# Altium PCB QR SCANNER NEW.PcbDoc (part 2 of 2)
Units mm, origin at the board's own origin, x right, y up, seen from the top; angles counter-clockwise.
Board outline 130 x 105 mm, 2 copper layers (Top Layer, Bottom Layer); 158 components, 113 nets, 501 pads, 106 vias.
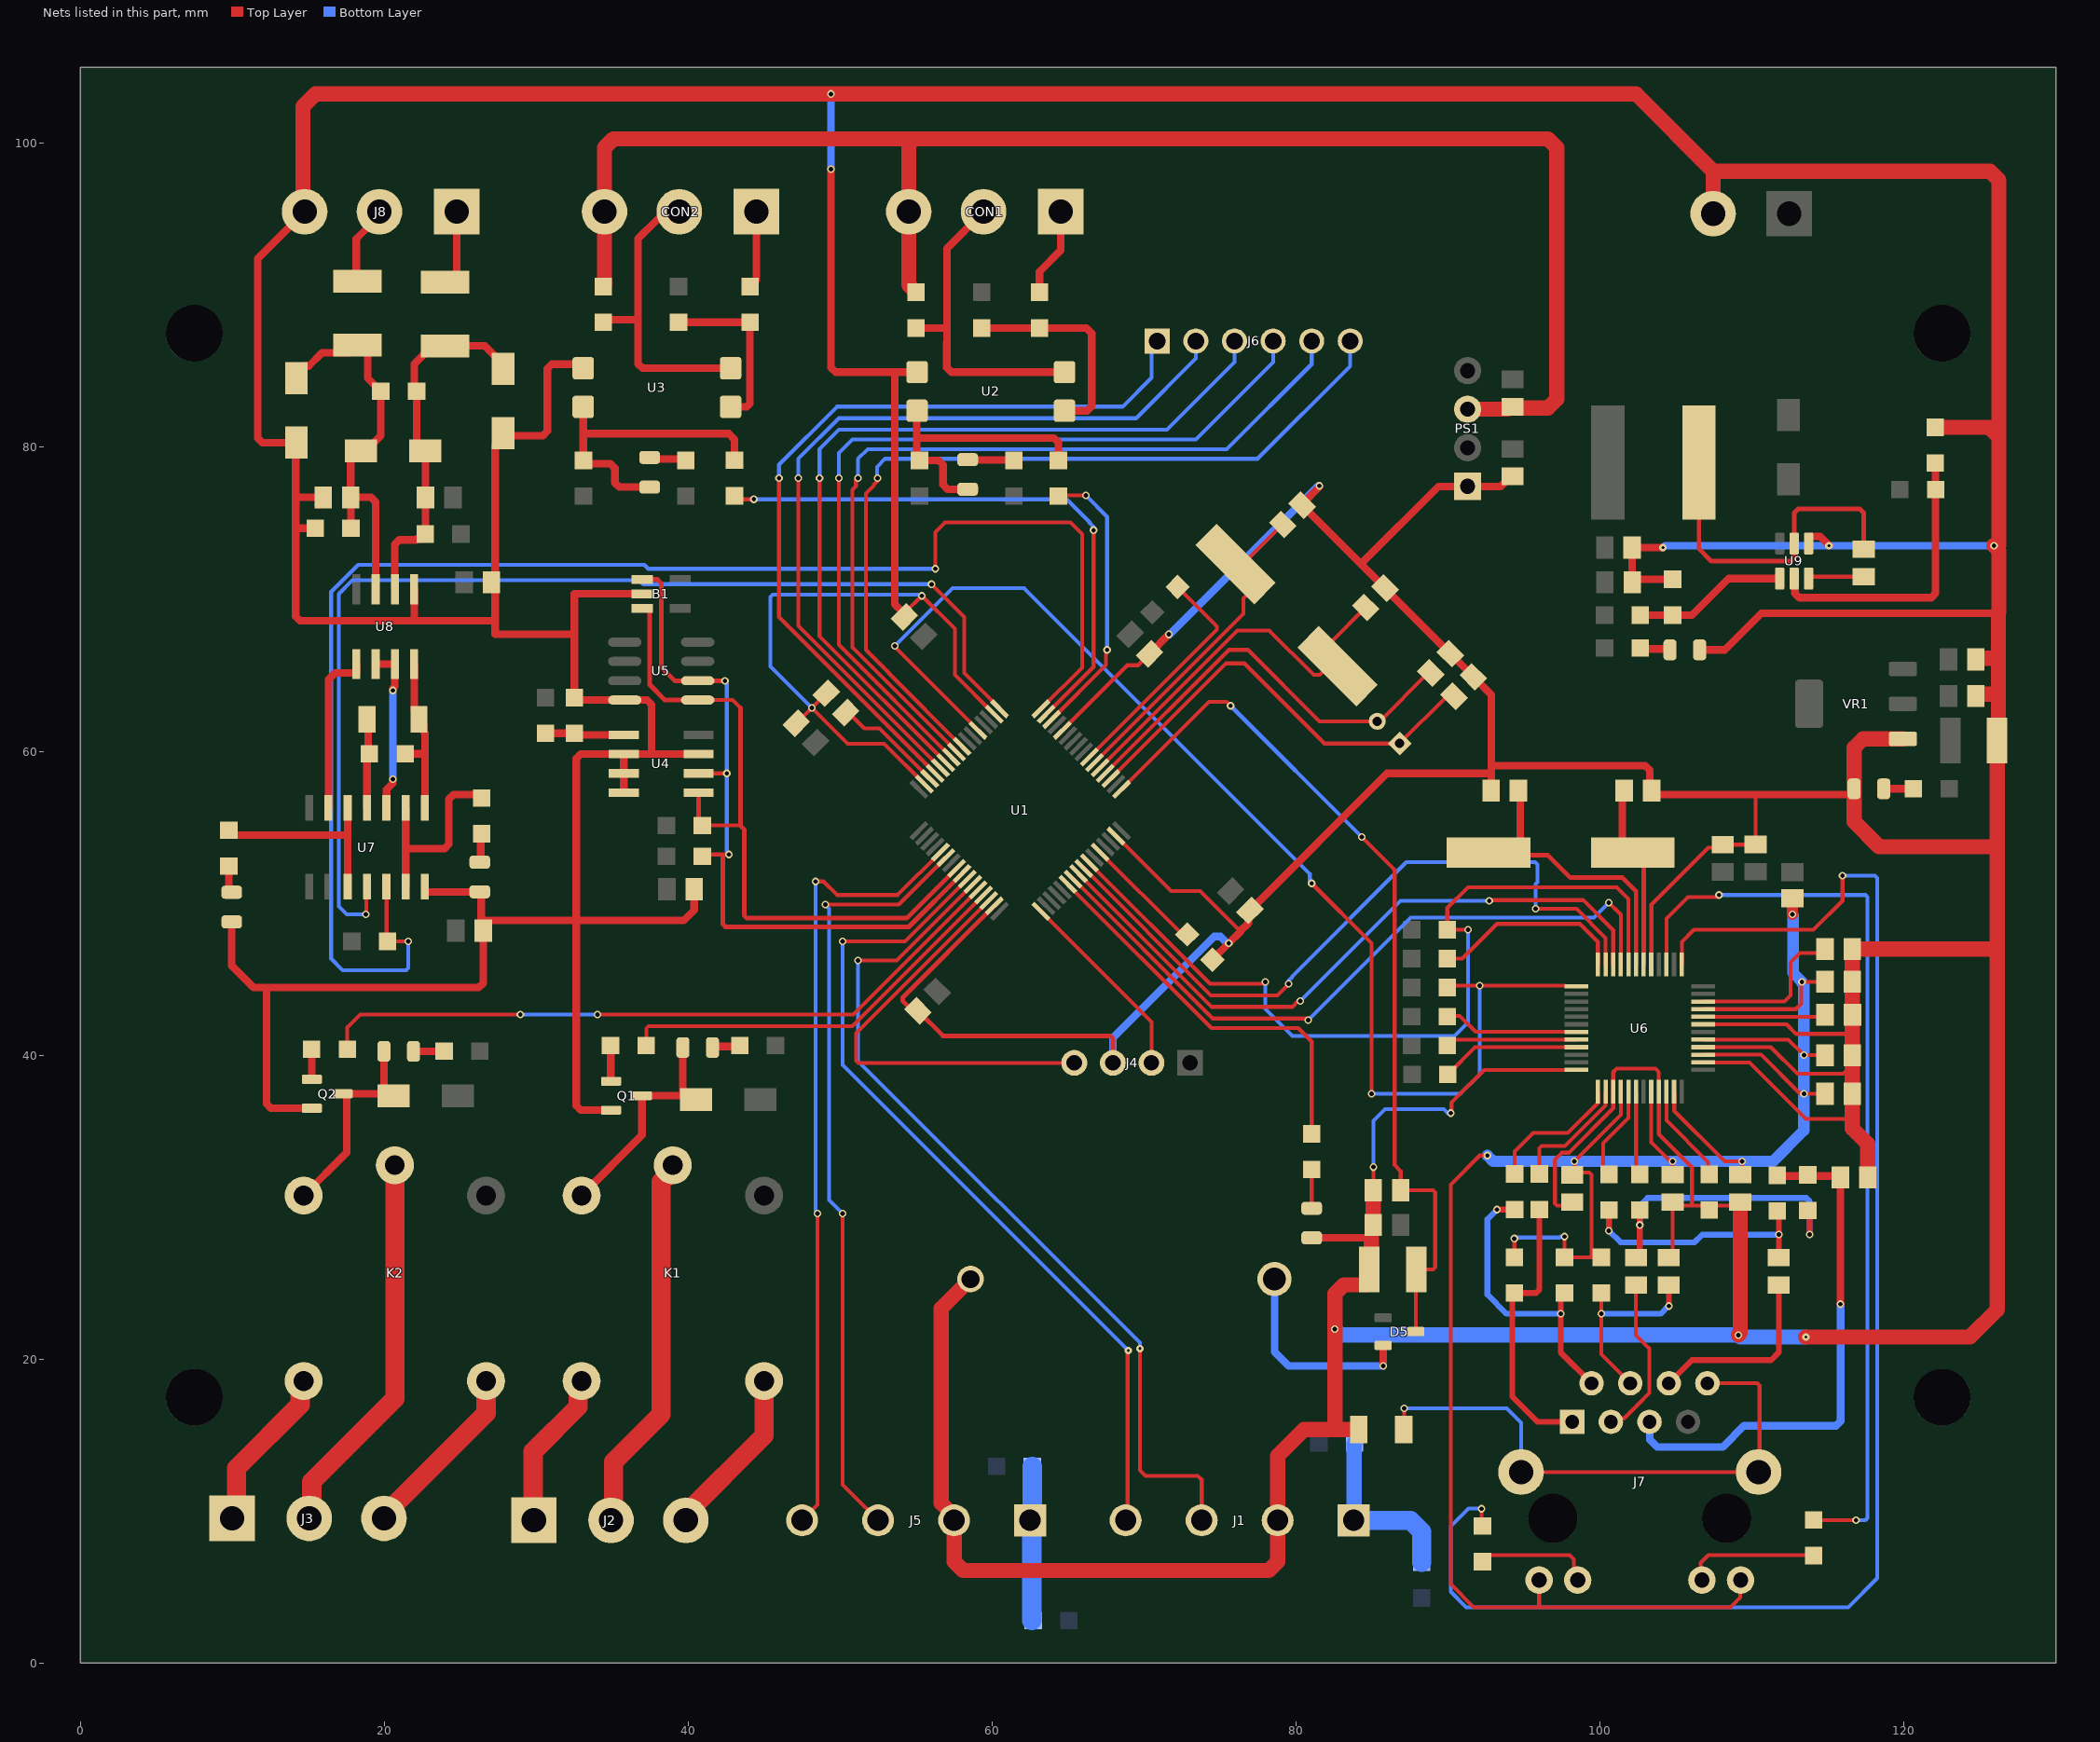
[diagram p2: the nets of this part, all layers, seen from the top]

## Via types
v1: diameter 0.5, hole 0.3, Top Layer to Bottom Layer, 101 vias
v2: diameter 0.5, hole 0.2, Top Layer to Bottom Layer, 5 vias

## Nets (pads, with @x,y where several pads share a name; then routed paths per layer and width w, separated by ;. In a path a pad name is that pad's centre, name@x,y a point inside that pad or via, vN(x,y) a via of type N, cw(c..) or ccw(c..) an arc to the next point about the centre after c; other vN are vias at no path point) (continued)
ACTLED: R44.1 U6.27 | length 61.5
  Top Layer w0.254: U6.27@104.366,45.963 104.366,48.994 105.775,50.403 107.68,50.403 v1(107.823,50.546) ; R44.1@114.046,9.43 114.078,9.398 v1(116.84,9.398)
  Bottom Layer w0.254: v1(107.823,50.546) 117.453,50.546 117.602,50.397 117.602,9.547 117.453,9.398 v1(116.84,9.398)
AVDD: C17.2 C18.2 C19.2 C20.2 C21.2 C22.2 FB1.2 J7.9 J7.12 R31.2 R32.2 R33.2 U6.4 U6.8 U6.11 U6.15 U6.17 U6.21 | length 152.6
  Top Layer w0.254: v1(92.583,33.401) 92.075,33.401 90.17,31.496 90.17,5.207 91.694,3.683 96.012,3.683 ; R31.2@94.361,26.702 v1(94.361,27.94) ; J7.9@95.986,5.465 95.986,3.709 96.012,3.683 ; R32.2@97.409,26.702 99.346,26.702 ; R32.2@97.663,26.702 v1(97.663,28.067) ; C17.2@98.171,32.131 98.32,32.28 99.292,32.28 99.441,32.131 99.441,26.797 99.346,26.702 ; C17.2@98.298,32.258 v1(98.298,33.02) 101.366,36.088 U6.4@101.366,37.603 ; R33.2@100.076,26.702 99.441,26.702 99.346,26.702 ; U6.8@103.366,37.603 103.366,34.264 104.61,33.02 v1(104.775,33.02) C18.2@104.775,32.142 ; U6.11@104.879,37.59 104.879,36.345 108.204,33.02 v1(109.347,33.02) ; U6.15@106.796,40.033 110.589,40.033 113.11,37.512 113.364,37.512 v1(113.411,37.465) C20.2@114.532,37.465 ; U6.17@106.796,41.033 112.383,41.033 v1(113.411,40.005) C21.2@114.797,40.005 ; U6.21@106.796,43.033 112.883,43.033 113.233,43.383 113.233,44.78 v1(113.284,44.831) C22.2@114.797,44.831 ; C19.2@109.22,32.142 109.347,32.269 v1@109.347,33.087 ; J7.12@109.246,5.465 109.231,5.45 109.231,4.329 108.585,3.683 96.012,3.683
  Top Layer w0.75: v1(112.649,49.276) FB1.2@112.649,50.321
  Bottom Layer w0.254: v1(94.361,27.94) 94.424,28.003 97.346,28.003 97.409,28.067
  Bottom Layer w0.75: v1(92.583,33.401) 92.964,33.02 v1(98.298,33.02) v1(104.775,33.02) 111.379,33.02 113.411,35.052 v1(113.411,37.465) v1(113.411,40.005) 113.411,44.636 v1@113.284,44.763 ; v1(112.649,49.276) 112.697,49.228 112.697,45.418 v1(113.284,44.831)
Cry_IN: C12.1 U1.3 XTAL1.1 | length 29.2
  Top Layer w0.254: U1.3@67.803,58.199 75.39,65.786 76.581,65.786 81.855,60.512 XTAL1.1@86.808,60.512 C12.1@89.927,63.631
  Top Layer w0.5: C12.1@89.927,63.631 90.386,63.631 C12.1@90.391,63.626
Cry_OUT: C13.1 U1.4 XTAL1.2 | length 28
  Top Layer w0.254: U1.4@67.449,58.552 75.572,66.675 76.835,66.675 81.534,61.976 XTAL1.2@85.344,61.976 ; XTAL1.2@85.511,61.976 C13.1@88.685,65.15
  Top Layer w0.5: XTAL1.2@85.344,61.976 XTAL1.2@85.511,61.976 ; C13.1@88.685,65.15 C13.1@88.867,65.15
DE/RE: U7.10 U8.2 U8.3 | length 11
  Top Layer w0.5: U8.2@19.431,65.735 U8.3@20.701,65.735 20.684,65.718 20.684,64.254 20.574,64.143 v1(20.574,64.008) ; U7.10@20.14,56.271 20.156,56.288 20.156,57.486 20.574,57.904 v1(20.574,58.166)
  Bottom Layer w0.5: v1(20.574,58.166) v1(20.574,64.008)
DI: D14.C R51.2 U7.8 U8.4 | length 11.1
  Top Layer w0.5: R51.2@21.377,59.832 22.665,59.832 22.68,59.817 ; U8.4@21.971,65.735 21.971,62.721 22.279,62.413 D14.C@22.279,62.103 22.584,61.798 22.584,61.291 22.68,61.195 22.68,59.817 ; U7.8@22.68,56.271 22.68,59.817
DI_TX1: R49.1 U1.16 U7.5 | length 102.2
  Top Layer w0.254: U7.5@20.156,51.073 20.156,47.567 R49.1@20.225,47.498 v1(21.59,47.498) ; v1(56.261,72.009) 56.261,74.422 56.896,75.057 65.151,75.057 65.913,74.295 65.913,65.501 U1.16@63.207,62.795
  Top Layer w0.5: U7.5@20.14,51.09 U7.5@20.156,51.073
  Bottom Layer w0.254: v1(21.59,47.498) 21.59,45.742 21.441,45.593 17.272,45.593 16.51,46.355 16.51,70.485 18.288,72.263 37.114,72.263 37.368,72.009 v1(56.261,72.009)
GND: B1.2 BT1.NEG C1.1 C2.1 C3.1 C4.1 C5.1 C6.1 C7.1 C8.1 C9.2 C10.2 C11.2 C12.2 C13.2 C14.1 C15.1 C16.1 C17.1 C18.1 C19.1 C20.1 C21.1 C22.1 C23.1 C26.1 C27.1 C28.1 C29.2 C30.1 C31.2 C32.2 C33.1 C35.2 C37.2 C38.2 C39.1 C40.2 C41.1 C42.1 D6.C D9.C D10.C D11.2 D13.1 D16.C D17.C J1.2 J4.03 J5.2 J8.3 J9.2 PS1.1 Q1.2 Q2.2 R4.1 R27.1 R41.1 R52.1 R53.2 R55.2 U1.12 U1.18 U1.31 U1.47 U1.63 U2.3 U3.3 U4.2 U4.3 U4.4 U4.7 U5.4 U6.3 U6.9 U6.14 U6.16 U6.19 U6.29 U6.48 U7.7 U8.5 U9.1 VR1.1 | length 962.1
  Top Layer w0.254: C3.1@47.116,61.85 47.118,61.85 v1(48.133,62.865) ; C6.1@49.148,63.88 v1(48.133,62.865) ; C2.1@54.226,69.032 54.3,69.032 54.3,69.159 v1(55.372,70.231) 57.543,68.06 57.543,65.037 U1.18@60.138,62.441 ; U1.31@55.542,57.845 52.883,60.504 50.494,60.504 v1(48.133,62.865) ; U1.12@64.621,61.381 68.899,65.659 69.599,65.659 C1.1@70.359,66.42 ; U1.63@68.156,54.423 71.779,50.8 73.686,50.8 76.327,48.159 76.34,48.146 ; C8.1@85.079,31.115 85.09,31.126 v1(85.09,32.639) ; v1(90.17,36.195) 90.221,36.246 90.221,36.881 92.373,39.033 U6.48@98.436,39.033 ; 92.837,59.055 92.964,59.055 ; C17.1@98.171,30.331 97.939,30.099 97.177,30.099 97.028,30.248 97.028,33.125 97.485,33.582 97.927,33.582 100.866,36.521 U6.3@100.866,37.603 100.866,38.89 101.092,39.116 103.632,39.116 103.853,38.895 103.853,37.616 U6.9@103.866,37.603 103.866,34.813 106.045,32.634 106.045,30.099 ; U6.29@103.366,45.963 103.379,45.976 103.379,49.912 107.12,53.653 107.49,53.653 C15.1@107.696,53.859 ; C23.1@104.521,26.681 104.775,26.935 104.775,29.894 104.98,30.099 C18.1@105.018,30.099 ; C18.1@104.775,30.342 C18.1@105.018,30.099 ; U6.14@106.796,39.533 106.809,39.52 109.832,39.52 113.538,35.814 116.586,35.814 ; U6.16@106.796,40.533 111.232,40.533 112.991,38.774 115.99,38.774 116.264,39.048 ; U6.19@106.796,42.033 112.272,42.033 112.903,41.402 116.459,41.402 ; C15.1@108.077,53.859 110.225,53.859 C16.1@110.236,53.87 110.236,57.023 110.363,57.15 ; C19.1@109.22,30.342 108.977,30.099 106.045,30.099 ; C18.1@105.018,30.099 106.045,30.099
  Top Layer w0.3: C4.1@55.117,42.925 56.766,41.275 67.769,41.275 67.945,41.099 J4.03@67.945,39.497 ; C4.1@55.142,42.545 54.123,43.564 54.123,43.812 U1.47@60.138,49.827
  Top Layer w0.5: D10.C@9.97,48.777 9.959,48.777 9.959,45.896 11.405,44.45 12.253,44.45 ; D13.1@14.176,79.998 14.176,76.678 ; D13.1@14.224,79.998 D13.1@14.224,80.308 11.977,80.308 11.684,80.601 11.684,92.423 J8.3@14.765,95.504 ; Q2.2@15.241,36.515 12.546,36.515 12.253,36.808 12.253,44.45 ; R52.1@15.462,74.676 14.176,74.676 ; C35.2@15.666,76.233 15.991,76.558 C35.2@15.991,76.708 14.206,76.708 14.176,76.678 ; U8.5@21.971,70.663 21.971,68.58 ; U7.7@22.68,51.09 22.68,50.766 22.696,50.75 26.295,50.75 D9.C@26.289,50.755 26.385,50.659 C33.1@26.385,48.864 ; U3.3@33.093,85.203 32.825,85.471 31.027,85.471 30.734,85.178 30.734,81.065 30.441,80.772 27.984,80.772 D11.2@27.813,80.943 27.813,80.633 27.305,80.125 27.305,71.363 C32.2@27.062,71.12 27.305,70.877 27.305,68.58 ; Q1.2@34.926,36.388 32.932,36.388 32.639,36.681 32.639,48.864 ; U4.4@35.763,57.277 U4.3@35.763,58.547 U4.2@35.763,59.817 ; B1.2@36.977,70.358 32.512,70.358 32.512,67.691 ; C14.1@40.397,50.927 40.397,49.541 39.72,48.864 32.639,48.864 ; U4.7@40.57,59.817 37.592,59.817 ; v1(49.403,98.298) 49.403,85.242 49.696,84.949 53.594,84.949 ; C2.1@54.226,69.032 53.594,69.664 53.594,84.949 ; U2.3@55.064,84.949 53.594,84.949 ; C1.1@70.359,66.42 v1(71.628,67.688) ; R4.1@74.491,46.286 74.491,46.291 75.565,47.366 v1(75.565,47.371) 76.34,48.146 ; 76.327,48.159 76.859,48.691 76.859,49.421 C5.1@76.965,49.527 85.985,58.547 92.837,58.547 ; D6.C@81.026,27.981 84.958,27.981 84.959,27.98 ; v1(81.534,77.47) 81.534,77.406 80.391,76.263 80.391,76.186 84.319,72.257 ; C29.2@92.837,57.415 92.837,58.547 ; 92.964,59.055 102.969,59.055 103.262,58.762 103.262,57.15 110.363,57.15 116.533,57.15 116.713,57.33 D17.C@116.713,57.531 ; C42.1@94.234,78.094 94.084,78.094 93.759,77.769 93.759,77.723 93.466,77.43 PS1.1@91.285,77.43 89.368,77.43 84.328,72.39 84.328,72.266 C10.2@85.853,70.74 85.853,70.709 C13.2@90.14,66.423 90.147,66.43 91.664,64.913 C12.2@91.664,64.899 92.837,63.726 92.837,59.055 92.837,58.547 ; C37.2@102.119,71.12 102.114,71.126 102.114,73.401 C38.2@102.108,73.406 v2(104.14,73.406) ; C37.2@102.194,71.311 R53.2@104.775,71.311 ; D16.C@106.553,66.675 108.204,66.675 110.617,69.088 126.206,69.088 ; U9.1@113.726,73.672 113.726,74.088 113.771,74.133 114.478,74.133 115.062,73.549 v2(115.062,73.533) ; 12.253,44.45 26.219,44.45 26.512,44.743 C33.1@26.512,48.199 26.385,48.326 C33.1@26.385,48.864 ; 14.176,74.676 14.176,68.873 14.469,68.58 21.971,68.58 ; 14.176,74.676 14.176,76.678 ; 21.971,68.58 27.305,68.58 ; C33.1@26.385,48.864 32.639,48.864 ; 27.305,68.58 27.305,67.691 32.512,67.691 ; 32.512,67.691 R27.1@32.512,63.532 32.671,63.373 U5.4@35.827,63.373 37.299,63.373 37.592,63.08 37.592,59.817 ; 32.639,48.864 32.639,59.524 32.932,59.817 U4.2@35.763,59.817 ; U4.2@35.763,59.817 37.592,59.817
  Top Layer w0.75: D13.1@14.224,79.998 D13.1@14.599,79.623
  Top Layer w1: J8.3@14.656,95.613 14.656,102.427 15.48,103.251 102.362,103.251 107.442,98.171 ; J5.2@57.498,9.398 57.498,6.682 58.084,6.096 78.201,6.096 78.787,6.682 J1.2@78.787,9.398 78.787,13.636 80.518,15.367 82.55,15.367 ; J5.2@57.498,9.678 56.642,10.534 56.642,23.335 BT1.NEG@58.58,25.273 ; v1(82.55,21.971) 82.55,15.367 ; v1@82.55,22.098 82.55,24.312 83.136,24.898 84.65,24.898 84.82,25.068 C9.2@84.82,25.908 84.959,26.047 84.959,27.98 ; C30.1@84.123,15.367 82.55,15.367 ; C7.1@85.079,28.702 C7.1@85.079,28.829 C8.1@85.079,31.115 ; C37.2@102.119,71.12 102.119,71.236 C37.2@102.194,71.311 ; J9.2@107.442,95.377 107.442,98.171 ; v1(109.093,21.59) 109.22,21.717 C19.1@109.22,30.342 ; v2(113.538,21.463) 124.333,21.463 126.127,23.257 126.127,46.99 ; D17.C@116.713,57.33 116.713,55.372 118.364,53.721 125.857,53.721 126.127,53.991 ; D17.C@116.713,57.531 116.713,60.233 117.299,60.819 VR1.1@119.925,60.819 ; C28.1@117.612,31.95 117.612,32.162 117.6,32.175 117.6,34.175 116.597,35.178 116.597,35.814 C20.1@116.597,37.465 116.597,39.048 C21.1@116.597,40.005 116.597,41.402 116.597,42.672 116.603,42.678 116.603,44.825 C22.1@116.597,44.831 C26.1@116.597,46.99 126.127,46.99 ; R55.2@122.047,81.312 125.62,81.312 126.238,80.694 ; C41.1@124.725,63.627 124.725,63.679 124.8,63.754 126.206,63.754 ; C39.1@124.725,66.04 124.8,66.115 126.127,66.115 126.206,66.194 ; v1(125.915,73.533) 126.238,73.21 126.238,69.12 126.206,69.088 126.206,66.194 ; 126.238,73.533 126.238,80.694 ; 107.442,98.171 125.652,98.171 126.238,97.585 126.238,80.694 ; 126.127,46.99 126.127,53.991 ; 126.127,53.991 C40.2@126.127,60.706 126.206,60.785 126.206,63.754 ; 126.206,63.754 126.206,66.194
  Top Layer w1.27: J8.3@14.656,95.613 J8.3@14.765,95.504
  Bottom Layer w0.254: v1(48.133,62.865) 45.409,65.589 45.409,70.152 45.558,70.301 55.128,70.301 55.151,70.278 55.325,70.278 v1(55.372,70.231) ; v1(85.09,32.639) 85.09,35.687 85.852,36.449 89.714,36.449 89.968,36.195 v1(90.17,36.195)
  Bottom Layer w0.5: v1(49.403,98.298) v1(49.403,103.251) ; J4.03@67.945,39.497 67.945,41.148 74.608,47.811 75.022,47.811 75.462,47.371 v1(75.565,47.371) ; v1(71.628,67.688) 71.69,67.688 81.472,77.47 v1(81.534,77.47) ; v2(104.14,73.406) 104.267,73.533 v1(125.915,73.533)
  Bottom Layer w1: v1(82.55,21.971) 82.931,21.59 v1(109.093,21.59) 109.22,21.463 v2(113.538,21.463)
IN1_12V: R15.2 U1.14 | length 18.7
  Top Layer w0.254: U1.14@63.914,62.088 67.493,65.667 67.493,66.604 v1(67.564,66.675) ; R15.2@64.359,76.789 64.405,76.835 v1(66.167,76.835)
  Bottom Layer w0.254: v1(66.167,76.835) 67.564,75.438 v1(67.564,66.675)
IN2_12V: R22.2 U1.15 | length 38.1
  Top Layer w0.254: R22.2@43.053,76.803 43.275,76.581 v1(44.323,76.581) ; U1.15@63.56,62.441 66.675,65.556 v1(66.675,74.549)
  Bottom Layer w0.254: v1(44.323,76.581) 64.897,76.581 66.433,75.045 66.433,74.993 66.675,74.751 v1(66.675,74.549)
INT: R29.1 U6.36 | length 12.8
  Top Layer w0.254: R29.1@89.948,46.355 90.932,46.355 93.218,48.641 98.679,48.641 99.853,47.467 99.853,45.976 U6.36@99.866,45.963
LED: R11.2 U1.54 | length 26.4
  Top Layer w0.254: U1.54@64.974,51.241 74.432,41.783 80.137,41.783 81.026,40.894 R11.2@81.026,34.83
LINKLED: R45.1 U6.25 | length 100.6
  Top Layer w0.254: v1(92.202,10.16) 92.202,9.077 R45.1@92.257,9.022 ; U6.25@105.366,45.963 105.379,45.976 105.379,47.467 106.172,48.26 114.046,48.26 115.951,50.165 v1(115.951,51.816)
  Bottom Layer w0.254: v1(92.202,10.16) 92.18,10.182 91.335,10.182 90.17,9.017 90.17,4.699 91.186,3.683 116.332,3.683 118.237,5.588 118.237,51.667 118.088,51.816 v1(115.951,51.816)
MISO: U1.56 U6.34 | length 44.8
  Top Layer w0.254: U1.56@65.682,51.948 74.449,43.18 79.742,43.18 80.123,43.561 v1(80.264,43.561) ; v1(92.71,50.165) 92.754,50.209 98.889,50.209 100.866,48.232 U6.34@100.866,45.963
  Bottom Layer w0.254: v1(80.264,43.561) 86.868,50.165 v1(92.71,50.165)
MOSI: U1.57 U6.35 | length 47.3
  Top Layer w0.254: U1.57@66.035,52.301 74.395,43.942 78.773,43.942 79.502,44.671 v1(79.502,44.704) ; v1(95.758,49.632) 98.45,49.632 100.366,47.716 U6.35@100.366,45.963
  Bottom Layer w0.254: v1(79.502,44.704) 79.502,44.906 79.744,45.148 79.744,45.2 87.249,52.705 95.736,52.705 95.885,52.556 95.885,51.394 95.758,51.267 v1(95.758,49.632)
NetBT1_POS: BT1.POS D5.2 | length 13.7
  Top Layer w0.5: v1(85.725,19.558) D5.2@85.725,20.903
  Bottom Layer w0.5: BT1.POS@78.58,25.273 78.58,20.48 79.502,19.558 v1(85.725,19.558)
NetC6_2: C6.2 U1.30 | length 7.3
  Top Layer w0.254: C6.2@50.368,62.543 50.547,62.543 51.588,61.501 52.593,61.501 U1.30@55.895,58.199
NetC23_2: C23.2 J7.P4 R33.1 | length 12.8
  Top Layer w0.254: R33.1@100.076,24.352 100.076,20.32 J7.P4@101.981,18.415
  Top Layer w0.381: v1(104.521,23.495) C23.2@104.521,24.881
  Bottom Layer w0.381: v1(100.076,22.987) 103.981,22.987 104.489,23.495 v1(104.521,23.495)
NetC26_2: C26.2 U6.22 | length 10.7
  Top Layer w0.254: U6.22@106.796,43.533 106.809,43.546 112.126,43.546 112.522,43.942 112.522,46.101 113.157,46.736 114.543,46.736 C26.2@114.797,46.99
NetC27_2: C27.2 U6.20 | length 8.1
  Top Layer w0.254: U6.20@106.796,42.533 114.669,42.533 C27.2@114.808,42.672
NetC28_2: C28.2 J7.P5 R42.1 R43.1 | length 35.1
  Top Layer w0.508: R42.1@111.654,32.1 111.702,32.052 113.665,32.052 115.765,32.052 C28.2@115.765,31.847 ; R43.1@113.665,32.131 R43.1@113.728,32.067 ; C28.2@115.812,31.95 115.812,23.634 v1(115.824,23.622)
  Bottom Layer w0.508: J7.P5@103.251,15.875 103.279,15.847 103.279,14.704 103.759,14.224 108.077,14.224 109.474,15.621 115.526,15.621 115.824,15.919 v1(115.824,23.622)
NetC34_1: C34.1 D11.1 D12.2 F1.1 R48.2 R50.2 U8.6 | length 23.9
  Top Layer w0.5: U8.6@20.701,70.663 20.701,73.621 20.994,73.914 22.083,73.914 22.139,73.97 22.376,73.97 R48.2@22.701,74.295 22.712,74.306 22.712,76.698 C34.1@22.722,76.708 22.722,79.723 D12.2@22.689,79.756 22.63,79.756 22.13,80.256 R50.2@22.13,83.693 21.971,83.852 21.971,85.491 23.153,86.673 F1.1@24.003,86.673 26.623,86.673 27.813,85.483 D11.1@27.813,85.173
NetC35_1: C35.1 D12.1 D13.2 F2.1 R50.1 R52.2 U8.7 | length 26.1
  Top Layer w0.5: D13.2@14.224,84.538 14.224,84.848 14.724,85.348 15.034,85.348 15.915,86.229 17.731,86.229 F2.1@18.231,86.729 18.423,86.729 18.923,86.229 18.923,84.55 R50.1@19.78,83.693 19.78,80.767 D12.1@18.813,79.8 ; R52.2@17.812,74.676 C35.1@17.812,76.708 ; D12.1@18.459,79.756 18.291,79.756 17.791,79.256 C35.1@17.791,76.708 C35.1@17.812,76.708 ; U8.7@19.431,70.663 19.431,76.415 19.138,76.708 C35.1@17.812,76.708
NetC36_1: C36.1 L1.1 U9.2 | length 22.5
  Top Layer w0.3: L1.1@106.505,78.994 106.505,73.327 107.315,72.517 112.566,72.517 112.742,72.693 112.742,73.638 U9.2@112.776,73.672 112.776,75.692 113.03,75.946 117.094,75.946 117.348,75.692 C36.1@117.348,73.29
NetC36_2: C36.2 U9.6 | length 3.7
  Top Layer w0.254: U9.6@113.726,71.362 U9.6@113.726,71.49
  Top Layer w0.3: U9.6@113.726,71.49 C36.2@117.348,71.49
NetCON1_1: CON1.1 R16.1 | length 5.9
  Top Layer w0.5: R16.1@63.119,90.202 63.119,91.567 64.516,92.964 CON1.1@64.516,95.504
NetCON1_2: CON1.2 R17.2 U2.2 | length 21.2
  Top Layer w0.5: 57.023,86.868 57.023,87.852 57.023,93.091 CON1.2@59.436,95.504
  Top Layer w0.508: R17.2@54.991,87.852 57.023,87.852 ; 57.023,86.868 57.023,85.247 57.321,84.949 U2.2@64.764,84.949
NetCON2_1: CON2.1 R25.1 | length 5.1
  Top Layer w0.5: R25.1@44.069,90.583 44.493,91.007 CON2.1@44.493,95.504
NetCON2_2: CON2.2 R26.2 U3.2 | length 20.2
  Top Layer w0.5: R26.2@34.417,88.233 34.576,88.392 36.703,88.392 ; CON2.2@39.413,95.504 38.934,95.026 38.003,95.026 36.703,93.726 36.703,88.392 ; U3.2@42.793,85.203 36.996,85.203 36.703,85.496 36.703,88.392
NetD1_A: D1.A R3.1 | length 1.9
  Top Layer w0.5: D1.A@41.599,40.509 41.664,40.575 43.337,40.575 R3.1@43.402,40.64
NetD1_C: D1.C D2.A K1.COIL2 Q1.3 | length 15.8
  Top Layer w0.5: Q1.3@36.956,37.338 D2.A@39.949,37.338 ; D1.C@39.649,40.509 39.649,37.638 D2.A@39.949,37.338 ; D2.A@39.949,37.338 40.203,37.084 D2.A@40.513,37.084 40.259,37.338 D2.A@39.949,37.338
  Top Layer w0.508: K1.COIL2@32.989,30.765 36.956,34.732 Q1.3@36.956,37.338
NetD3_A: D3.A R7.1 | length 2
  Top Layer w0.5: D3.A@21.93,40.255 21.935,40.259 23.939,40.259 R7.1@23.943,40.264
NetD3_C: D3.C D4.A K2.COIL2 Q2.3 | length 14.5
  Top Layer w0.5: K2.COIL2@14.701,30.765 17.526,33.59 Q2.3@17.526,37.465 ; Q2.3@17.271,37.465 Q2.3@17.526,37.465 ; D3.C@19.98,40.255 19.98,37.834 D4.A@20.349,37.465 ; Q2.3@17.526,37.465 D4.A@20.349,37.465 ; D4.A@20.349,37.465 20.48,37.334 D4.A@20.618,37.334 20.487,37.465 D4.A@20.349,37.465
NetD6_A: D6.A R11.1 | length 2.5
  Top Layer w0.254: D6.A@81.026,29.931 R11.1@81.026,32.48
NetD7_A: D7.A R12.1 | length 3.1
  Top Layer w0.5: D7.A@58.39,79.193 58.417,79.166 61.411,79.166 R12.1@61.438,79.139
NetD7_C: D7.C R14.2 R15.1 U2.4 | length 18.7
  Top Layer w0.5: R14.2@55.042,79.139 55.042,80.774 ; U2.4@55.064,82.409 55.042,82.409 55.042,80.774 ; R14.2@55.215,79.139 56.476,79.139 56.769,78.846 56.769,77.536 57.062,77.243 D7.C@58.39,77.243 ; R15.1@64.359,79.139 64.359,80.322 64.066,80.615 55.201,80.615 55.042,80.774
NetD8_A: D8.A R18.1 | length 2.5
  Top Layer w0.5: D8.A@37.465,79.334 37.563,79.236 39.751,79.236 R18.1@39.848,79.139
NetD8_C: D8.C R19.2 R22.1 U3.4 | length 20.6
  Top Layer w0.5: U3.4@33.093,82.663 33.093,80.899 ; D8.C@37.465,77.384 35.472,77.384 35.179,77.677 35.179,78.628 34.886,78.921 33.335,78.921 R19.2@33.117,79.139 33.093,79.163 33.093,80.899 ; R22.1@43.053,79.153 43.053,80.518 42.672,80.899 33.093,80.899
NetD9_A: D9.A R46.1 | length 1.9
  Top Layer w0.5: D9.A@26.289,52.705 26.352,52.768 26.352,54.514 R46.1@26.416,54.578
NetD10_A: D10.A R47.1 | length 1.8
  Top Layer w0.5: R47.1@9.779,52.451 9.779,50.907 9.959,50.728 D10.A@9.97,50.728
NetD14_A: D14.A R51.1 U7.11 | length 6
  Top Layer w0.5: D14.A@18.869,62.103 18.948,62.024 18.948,59.91 R51.1@19.027,59.832 18.87,59.675 U7.11@18.87,56.271
NetD16_A: D16.A R57.1 | length 2
  Top Layer w0.5: R57.1@102.648,66.802 102.712,66.739 104.539,66.739 D16.A@104.603,66.675
NetD17_A: D17.A R58.1 | length 2
  Top Layer w0.5: D17.A@118.663,57.531 R58.1@120.618,57.531
NetF1_2: F1.2 J8.1 | length 5
  Top Layer w0.5: F1.2@24.003,90.873 24.265,90.873 24.765,91.373 J8.1@24.765,95.377
NetF2_2: F2.2 J8.2 | length 5.1
  Top Layer w0.5: F2.2@18.231,90.929 18.161,90.999 18.161,93.719 19.685,95.243 J8.2@19.685,95.377
NetJ1_1: J1.1 R1.2 R2.2 | length 11.9
  Bottom Layer w1: J1.1@83.787,9.398 83.819,9.431 83.819,14.445 R2.2@83.852,14.478
  Bottom Layer w1.27: J1.1@83.787,9.398 87.521,9.398 88.265,8.654 R1.2@88.265,6.636
NetJ2_1: J2.1 K1.NO | length 10.5
  Top Layer w1.27: J2.1@29.798,9.398 29.798,13.923 32.754,16.879 32.754,18.33 K1.NO@32.989,18.565
NetJ2_2: J2.2 K1.COM | length 24.7
  Top Layer w1.27: J2.2@34.878,9.779 35.087,9.988 35.087,13.243 38.227,16.383 38.227,31.67 38.989,32.432 K1.COM@38.989,32.765
NetJ2_3: J2.3 K1.NC | length 10.9
  Top Layer w1.27: J2.3@39.798,9.779 44.989,14.97 K1.NC@44.989,18.565
NetJ3_1: J3.1 K2.NO | length 10.7
  Top Layer w1.27: J3.1@10.033,9.779 10.281,10.027 10.281,12.821 14.466,17.006 14.466,18.33 K2.NO@14.701,18.565
NetJ3_2: J3.2 K2.COM | length 25.3
  Top Layer w1.27: J3.2@15.113,9.779 15.235,9.901 15.235,11.933 20.701,17.399 K2.COM@20.701,32.765
NetJ3_3: J3.3 K2.NC | length 11.5
  Top Layer w1.27: J3.3@20.033,9.779 26.701,16.447 K2.NC@26.701,18.565
NetJ5_1: J5.1 R9.2 R10.2 | length 10.3
  Bottom Layer w1.27: R9.2@62.611,2.794 62.611,9.285 J5.1@62.498,9.398 62.643,9.543 R10.2@62.643,12.954
NetJ7_10: J7.10 R45.2 | length 7.8
  Top Layer w0.254: R45.2@92.257,6.672 92.697,7.112 97.989,7.112 98.263,6.838 98.263,5.728 J7.10@98.526,5.465
NetJ7_11: J7.11 R44.2 | length 8.8
  Top Layer w0.254: J7.11@106.706,5.465 106.706,5.886 106.608,5.984 106.608,6.601 107.118,7.112 114.014,7.112 R44.2@114.046,7.08
NetQ1_1: Q1.1 R6.2 | length 2.4
  Top Layer w0.5: R6.2@34.893,40.64 34.91,40.623 34.91,38.305 Q1.1@34.926,38.288
NetQ2_1: Q2.1 R8.2 | length 2
  Top Layer w0.5: R8.2@15.224,40.396 15.233,40.388 15.233,38.423 Q2.1@15.241,38.415
NetR4_2: R4.2 U1.60 | length 8
  Top Layer w0.254: U1.60@67.096,53.362 72.51,47.948 R4.2@72.829,47.948
NetR13_2: R13.2 R16.2 U2.1 | length 14.1
  Top Layer w0.508: R13.2@59.309,87.852 R16.2@63.119,87.852 66.199,87.852 66.548,87.503 66.548,82.707 66.25,82.409 U2.1@64.764,82.409
NetR20_2: R20.2 R25.2 U3.1 | length 11.4
  Top Layer w0.5: R20.2@39.37,88.233 R25.2@44.069,88.233 44.069,82.88 43.852,82.663 U3.1@42.793,82.663
NetR21_1: R21.1 R27.2 U4.1 | length 5.5
  Top Layer w0.5: R21.1@30.607,61.182 R27.2@32.512,61.182 32.607,61.087 U4.1@36.049,61.087
NetR34_2: R34.2 U6.1 | length 9
  Top Layer w0.254: R34.2@94.381,32.195 94.381,33.675 95.594,34.888 97.88,34.888 99.853,36.861 99.853,37.59 U6.1@99.866,37.603
NetR36_2: R36.2 U6.2 | length 8.1
  Top Layer w0.254: R36.2@96.012,32.195 96.012,33.887 96.161,34.036 97.681,34.036 100.353,36.708 100.353,37.59 U6.2@100.366,37.603
NetR39_2: R39.2 U6.5 | length 6.2
  Top Layer w0.254: R39.2@100.203,32.131 100.203,34.208 101.866,35.871 U6.5@101.866,37.603
NetR40_2: R40.2 U6.6 | length 5.5
  Top Layer w0.254: U6.6@102.366,37.603 102.366,32.421 102.366,32.413 R40.2@102.616,32.163
NetR41_2: R41.2 U6.10 | length 6.6
  Top Layer w0.254: U6.10@104.366,37.603 104.366,35.715 107.111,32.97 107.111,32.24 R41.2@107.188,32.163
NetR46_2: R46.2 U7.6 U7.9 | length 13.5
  Top Layer w0.5: U7.6@21.41,51.09 21.41,53.594 ; U7.9@21.41,56.271 21.41,53.594 ; R46.2@26.416,56.928 26.194,57.15 24.55,57.15 24.257,56.857 24.257,53.887 23.964,53.594 21.41,53.594
NetR47_2: R47.2 U7.3 U7.12 | length 13.1
  Top Layer w0.5: R47.2@9.779,54.801 10.097,54.483 17.6,54.483 ; U7.3@17.6,51.09 17.6,54.483 ; U7.12@17.6,56.271 17.6,54.483
NetR53_1: R53.1 R56.2 U9.4 | length 10.2
  Top Layer w0.5: R56.2@102.648,68.961 R53.1@104.775,68.961 106.045,68.961 108.446,71.362 U9.4@111.826,71.362
NetR54_2: R54.2 R55.1 U9.5 | length 19.1
  Top Layer w0.3: R55.1@122.047,78.962 R55.1@122.079,78.93
  Top Layer w0.5: U9.5@112.776,71.362 112.821,71.317 112.821,70.397 113.114,70.104 121.786,70.104 122.079,70.397 R54.2@122.079,77.216 R55.1@122.079,78.93
NRST: R5.2 U1.7 | length 15.9
  Top Layer w0.254: U1.7@66.389,59.613 74.789,68.013 74.789,68.224 R5.2@72.065,70.947
OSC_IN: C10.1 U1.5 Y1.2 | length 25.6
  Top Layer w0.254: U1.5@67.096,58.906 76.135,67.945 78.232,67.945 81.153,65.024 81.569,65.024 81.823,65.278 82.203,65.278 Y1.2@82.457,65.024 ; Y1.2@82.255,67.142 C10.1@84.581,69.468
  Top Layer w0.5: Y1.2@82.255,67.142 82.255,66.081 Y1.2@82.734,65.602
OSC_OUT: C11.1 U1.6 Y1.1 | length 21.9
  Top Layer w0.254: U1.6@66.742,59.259 76.53,69.047 76.53,70.063 76.784,70.317 76.784,70.817 75.776,71.825 Y1.1@76.016,71.825 ; Y1.1@76.263,72.072 C11.1@79.118,74.927
  Top Layer w0.5: Y1.1@76.016,71.825 Y1.1@76.016,72.32
PA2_TX16: J1.4 U1.42 | length 55.9
  Top Layer w0.254: v1(50.165,47.498) 54.274,47.498 U1.42@58.37,51.594 ; J1.4@68.787,9.398 68.914,9.525 68.914,20.527 v2(68.961,20.574)
  Bottom Layer w0.254: v1(50.165,47.498) 50.165,39.37 v2(68.961,20.574)
PA3_RX17: J1.3 U1.43 | length 57.8
  Top Layer w0.254: v1(51.181,46.228) 53.711,46.228 U1.43@58.724,51.241 ; v2(69.723,20.701) 69.723,12.7 70.104,12.319 73.533,12.319 73.787,12.065 J1.3@73.787,9.398
  Bottom Layer w0.254: v1(51.181,46.228) 51.181,39.624 69.723,21.082 v2(69.723,20.701)
PB2: J6.1 U1.29 | length 54
  Top Layer w0.254: v1(45.974,77.978) 45.974,68.827 U1.29@56.249,58.552
  Bottom Layer w0.254: v1(45.974,77.978) 45.974,78.867 49.784,82.677 68.58,82.677 70.485,84.582 70.485,86.614 J6.1@70.866,86.995
PB10: J6.2 U1.28 | length 54.3
  Top Layer w0.254: v1(47.244,77.978) 47.244,68.264 U1.28@56.602,58.906
  Bottom Layer w0.254: v1(47.244,77.978) 47.244,79.248 49.911,81.915 69.469,81.915 73.406,85.852 J6.2@73.406,86.995
PB12: J6.3 U1.27 | length 55.1
  Top Layer w0.254: v1(48.641,77.978) 48.641,67.574 U1.27@56.956,59.259
  Bottom Layer w0.254: v1(48.641,77.978) 48.641,79.883 49.911,81.153 71.501,81.153 75.946,85.598 J6.3@75.946,86.995
PB13: J6.4 U1.26 | length 55.5
  Top Layer w0.254: v1(49.911,77.978) 49.911,67.011 U1.26@57.309,59.613
  Bottom Layer w0.254: v1(49.911,77.978) 49.911,79.629 50.8,80.518 73.406,80.518 78.486,85.598 J6.4@78.486,86.995
PB14: J6.5 U1.25 | length 56.2
  Top Layer w0.254: v1(51.181,77.978) 51.038,77.835 51.038,77.454 50.8,77.216 50.8,66.829 U1.25@57.663,59.967
  Bottom Layer w0.254: v1(51.181,77.978) 51.181,79.248 51.816,79.883 75.438,79.883 81.026,85.471 J6.5@81.026,86.995
PB15: J6.6 U1.24 | length 56.9
  Top Layer w0.254: v1(52.451,77.978) 52.451,77.776 52.209,77.534 52.209,77.482 51.689,76.962 51.689,66.675 53.213,65.151 53.213,65.124 U1.24@58.016,60.32
  Bottom Layer w0.254: v1(52.451,77.978) 52.421,78.008 52.421,78.71 52.959,79.248 77.47,79.248 83.566,85.344 J6.6@83.566,86.995
PC6_TX37: J5.4 U1.37 | length 52.3
  Top Layer w0.254: J5.4@47.498,9.398 48.514,10.414 v1(48.514,29.591) ; v1(48.387,51.435) 48.895,51.435 49.784,50.546 53.786,50.546 U1.37@56.602,53.362
  Bottom Layer w0.254: v1(48.387,51.435) 48.387,29.785 48.514,29.658 v1(48.514,29.591)
PC7_RX38: J5.3 U1.38 | length 51.2
  Top Layer w0.254: v1(49.022,49.911) 53.858,49.911 U1.38@56.956,53.009 ; v1(50.165,29.591) 50.165,11.731 J5.3@52.498,9.398
  Bottom Layer w0.254: v1(49.022,49.911) 49.022,49.893 49.276,49.639 49.276,30.48 v1(50.165,29.591)
PMODE0: R35.1 U6.45 | length 9.2
  Top Layer w0.254: R35.1@89.98,38.735 91.778,40.533 U6.45@98.436,40.533
PMODE1: R37.1 U6.44 | length 8.7
  Top Layer w0.254: R37.1@89.948,40.64 90.341,41.033 U6.44@98.436,41.033
PMODE2: R38.1 U6.43 | length 8.9
  Top Layer w0.254: R38.1@89.948,42.545 89.998,42.595 90.755,42.595 91.817,41.533 U6.43@98.436,41.533
Relay1: R6.1 U1.45 | length 26.7
  Top Layer w0.254: R6.1@37.243,40.64 37.243,41.761 ; 37.392,41.91 50.807,41.91 U1.45@59.431,50.534
Relay2: R8.1 U1.44 | length 46.7
  Top Layer w0.254: R8.1@17.574,40.396 17.574,41.831 18.415,42.672 v1(28.956,42.672) ; v1(34.036,42.672) 50.862,42.672 U1.44@59.077,50.887
  Bottom Layer w0.254: v1(28.956,42.672) v1(34.036,42.672)
RJ45_N: C25.1 J7.P6 | length 12.5
  Top Layer w0.381: J7.P6@104.521,18.415 106.045,19.939 111.252,19.939 111.76,20.447 C25.1@111.76,24.881
RJ45_P: C24.1 J7.P3 | length 10.8
  Top Layer w0.254: J7.P3@100.946,16.11 101.581,16.11 102.489,17.018 103.251,17.78 103.251,20.705 102.362,21.594 C24.1@102.362,24.881
  Top Layer w0.381: J7.P3@100.711,15.875 J7.P3@100.946,16.11
RO: U7.13 U8.1 | length 11
  Top Layer w0.5: U7.13@16.33,56.271 16.33,64.717 16.764,65.151 18.144,65.151 18.161,65.168 U8.1@18.161,65.735
RO_RX1: U1.17 U7.4 | length 73.9
  Top Layer w0.254: v1(18.796,49.276) 18.833,49.313 18.833,51.053 U7.4@18.87,51.09 ; v1(56.007,70.993) 58.166,68.834 58.166,65.153 60.491,62.827 U1.17@60.491,62.795
  Bottom Layer w0.254: v1(18.796,49.276) 17.526,49.276 17.018,49.784 17.018,70.351 17.914,71.247 36.8,71.247 37.054,70.993 v1(56.007,70.993)
RST: R30.1 U1.21 U6.37 | length 82.8
  Top Layer w0.254: v1(53.594,66.929) 53.594,66.864 U1.21@59.077,61.381 ; v1(81.026,51.308) 84.963,47.371 v1(84.963,37.465) ; R30.1@89.948,44.45 90.075,44.577 97.652,44.577 97.683,44.546 98.423,44.546 U6.37@98.436,44.533
  Bottom Layer w0.254: v1(53.594,66.929) 57.404,70.739 62.103,70.739 80.899,51.943 80.899,51.308 v1(81.026,51.308) ; v1(84.963,37.465) 90.805,37.465 92.075,38.735 v1(92.075,44.577)
RX_N: C25.2 R39.1 R42.2 | length 16.2
  Top Layer w0.381: v1(100.584,28.448) R39.1@100.584,29.813 ; R42.2@111.654,29.75 111.76,29.644 C25.2@111.76,26.681
  Bottom Layer w0.381: v1(100.584,28.448) 101.346,27.686 106.215,27.686 106.723,28.194 v1(111.76,28.194)
RX_P: C24.2 R40.1 R43.2 | length 19.8
  Top Layer w0.381: C24.2@102.362,26.681 102.616,26.935 v1(102.616,28.829) R40.1@102.616,29.813 ; R43.2@113.665,29.781 113.792,29.654 v1(113.792,28.194)
  Bottom Layer w0.381: v1(102.616,28.829) 102.616,30.099 103.124,30.607 113.569,30.607 113.792,30.384 v1(113.792,28.194)
SCL: B1.1 R24.1 U1.41 U4.6 U5.6 | length 48.5
  Top Layer w0.3: B1.1@36.977,71.308 37.979,71.308 38.227,71.06 38.227,65.532 39.116,64.643 U5.6@40.627,64.643 v1(42.418,64.643) ; U4.6@40.691,58.547 v1(42.545,58.547) ; R24.1@40.926,53.086 41.053,53.213 42.291,53.213 ; v1(42.672,53.213) 42.291,53.213 ; U1.41@58.016,51.948 54.514,48.445 42.467,48.445 42.291,48.621 42.291,53.213
  Bottom Layer w0.3: v1(42.418,64.643) 42.418,64.589 42.545,64.462 v1(42.545,58.547) 42.545,53.394 42.672,53.267 v1(42.672,53.213)
SCS: R28.1 U1.58 U6.32 | length 57.2
  Top Layer w0.254: U1.58@66.389,52.655 74.34,44.704 77.851,44.704 v1(77.978,44.831) ; v1(91.313,48.26) R28.1@89.948,48.26 89.948,49.689 91.313,51.054 101.092,51.054 101.866,50.28 U6.32@101.866,45.963
  Bottom Layer w0.254: v1(77.978,44.831) 77.978,43.053 79.756,41.275 90.424,41.275 91.313,42.164 v1(91.313,48.26)
SDA: B1.3 R23.1 U1.40 U4.5 U5.5 | length 45.3
  Top Layer w0.254: U5.5@40.627,63.373 42.926,63.373 43.434,62.865 ; R23.1@40.926,55.118 43.434,55.118
  Top Layer w0.3: B1.3@36.977,69.408 37.315,69.408 37.465,69.258 37.465,64.389 38.481,63.373 U5.5@40.627,63.373 ; R23.1@40.691,55.353 40.691,56.896 ; 43.434,62.865 43.449,62.85 43.449,55.133 43.434,55.118 43.688,54.864 43.688,49.198 43.864,49.022 54.383,49.022 U1.40@57.663,52.301
SGND: C30.2 J7.P8 J7.S1 J7.S2 | length 37.6
  Top Layer w0.254: C30.2@87.073,15.367 87.122,15.416 v1(87.122,16.764) ; J7.S1@94.801,12.575 J7.S2@110.431,12.575 110.49,12.634 110.49,18.266 110.341,18.415 J7.P8@107.061,18.415
  Bottom Layer w0.254: v1(87.122,16.764) 93.853,16.764 94.801,15.816 J7.S1@94.801,12.575
SWCLK: J4.02 U1.49 | length 13
  Top Layer w0.254: U1.49@63.207,49.473 70.485,42.195 J4.02@70.485,39.497
SWDIO: J4.04 U1.46 | length 28.6
  Top Layer w0.254: U1.46@59.784,50.18 51.054,41.45 51.054,39.646 51.203,39.497 J4.04@65.405,39.497
SWO/sck1: U1.55 U6.33 | length 46.7
  Top Layer w0.254: U1.55@65.328,51.594 74.504,42.418 80.672,42.418 v1(80.786,42.303) ; v1(100.584,50.038) 101.366,49.256 U6.33@101.366,45.963
  Bottom Layer w0.254: v1(80.786,42.303) 80.786,42.305 87.536,49.055 99.601,49.055 v1(100.584,50.038)
TX_N: J7.P2 R32.1 R34.1 | length 19.2
  Top Layer w0.381: v1(93.218,29.845) R34.1@94.381,29.845 ; R32.1@97.663,24.352 97.409,24.098 v1(97.409,22.987) 97.409,20.447 J7.P2@99.441,18.415
  Bottom Layer w0.381: v1(93.218,29.845) 92.583,29.21 92.583,24.257 93.853,22.987 v1(97.409,22.987)
TX_P: J7.P1 R31.1 R36.1 | length 18.3
  Top Layer w0.381: R31.1@94.361,24.352 94.234,24.225 94.234,17.526 95.885,15.875 J7.P1@98.171,15.875 ; R31.1@94.598,24.352 95.789,24.352 96.012,24.575 R36.1@96.012,29.845
VBAT: C8.2 C9.1 D5.3 U1.1 | length 58.8
  Top Layer w0.254: U1.1@68.51,57.492 74.264,63.246 75.438,63.246 v1(75.692,62.992) ; v1(84.328,54.356) 86.487,52.197 86.487,32.766 86.879,32.374 C8.2@86.879,31.115 89.005,31.115 89.154,30.966 89.154,26.057 89.005,25.908 C9.1@87.9,25.908 87.875,25.883 D5.3@87.875,21.818
  Bottom Layer w0.254: v1(75.692,62.992) v1(84.328,54.356)
XGND: C43.1 CON1.3 CON2.3 PS1.3 R17.1 R26.1 | length 105.5
  Top Layer w1: R26.1@34.417,90.583 34.493,90.659 CON2.3@34.493,95.504 34.493,99.711 35.078,100.297 54.864,100.297 ; R17.1@54.991,90.202 54.516,90.677 CON1.3@54.516,95.504 54.516,99.949 54.864,100.297 ; PS1.3@91.285,82.51 93.928,82.51 94.084,82.666 C43.1@94.234,82.666 94.309,82.591 96.569,82.591 97.155,83.177 97.155,99.711 96.569,100.297 54.864,100.297
XI: C31.1 U6.30 Y2.2 | length 12.6
  Top Layer w0.3: Y2.2@102.159,53.34 102.866,52.49 U6.30@102.866,45.963
  Top Layer w0.5: C31.1@101.462,57.404 101.462,53.021 Y2.2@101.905,52.578
XO: C29.1 U6.31 Y2.1 | length 20.8
  Top Layer w0.3: Y2.1@92.659,53.34 94.107,53.34 94.742,53.34 94.921,53.161 96.572,53.161 98.044,51.689 101.473,51.689 102.366,50.796 U6.31@102.366,45.963
  Top Layer w0.5: Y2.1@93.992,52.578 93.992,53.225 94.107,53.34 94.742,53.975 94.742,57.288 C29.1@94.626,57.404
pads on no net: B1.5 H1.1 H2.1 H3.1 H4.1 J7. J7.P7 U1.2 U1.8 U1.9 U1.10 U1.11 U1.20 U1.22 U1.23 U1.33 U1.34 U1.35 U1.36 U1.39 U1.50 U1.51 U1.52 U1.53 U1.59 U1.61 U1.62 U5.1 U5.2 U5.3 U5.7 U6.7 U6.12 U6.13 U6.18 U6.23 U6.24 U6.26 U6.38 U6.39 U6.40 U6.41 U6.42 U6.46 U6.47 U7.1 U7.2
copper on no net: | length 470
  Top Layer w0.254: 0,0 130,0 130,105 0,105 0,0

## Polygon pours and split planes (outlines as drawn)
GND on Top Layer "GND_L01_P001" (solid, remove dead copper, pour order 1): 10.795,20.948 10.795,14.628 10.765,14.598 0,14.598 0,0 129.993,0 129.993,14.438 129.318,14.438 129.286,14.471 129.266,14.451 118.792,14.451 118.894,14.552 118.894,20.419 129.977,20.419 130.022,20.464 130.022,84.442 130,84.464 118.552,84.464 118.554,84.466 118.554,90.814 118.553,90.815 129.985,90.815 129.999,90.801 130.007,90.808 130.007,104.986 0.007,104.986 0.02,104.973 0.02,90.584 10.628,90.584 10.668,90.544 10.668,84.448 0,84.448 0,20.948
GND on Bottom Layer "GND_L02_P002" (solid, remove dead copper, pour order 2): 10.795,20.948 10.795,14.628 10.765,14.598 0,14.598 0,0 129.993,0 129.993,14.438 129.318,14.438 129.286,14.471 129.266,14.451 118.792,14.451 118.894,14.552 118.894,20.419 129.977,20.419 130.022,20.464 130.022,84.442 130,84.464 118.552,84.464 118.554,84.466 118.554,90.814 118.553,90.815 129.985,90.815 129.999,90.801 130.007,90.808 130.007,104.986 0.007,104.986 0.02,104.973 0.02,90.584 10.628,90.584 10.668,90.544 10.668,84.448 0,84.448 0,20.948

## Keep-outs
Keep-Out Layer:
  lines w0.54: 463.042,-206.248 cw(c463.042,-209.769) 466.563,-209.769

## Text inside footprints (layer, text, board x,y; h text height)
BT1: Mechanical 13 "-" at 54.77,26.035 h1.42 r90; Mechanical 13 "+" at 80.054,25.273 h1.42 r180; Bottom Overlay "-" at 54.77,26.035 h1.42 r90; Bottom Overlay "+" at 80.01,25.273 h1.42 r180